# EAGLE board Greenhouse (EAGLE 9.7.0)

Size 101.83 x 101.41 mm. Coordinates in mm from the lower left corner, seen from the top.
Outline: 0,0 101.83,0 101.83,101.41 0,101.41 0,0
Copper layers (1*16): Top 0.035mm / dielectric 1.5mm / Bottom 0.035mm
Design rules "default": minimum track width 6mil, minimum drill 0.35mm, track to track 6mil, track to pad 6mil, pad to pad 6mil, via to via 6mil, smd to smd 6mil, copper to edge 40mil, drill to drill 6mil, minimum pad ring 10mil, minimum via ring 8mil, stop-mask expansion 4mil, vias tented up to drill 0mil, thermal gap 10mil

## Footprints (pad centres in the part's own frame; a part is rotated, then mirrored left to right if it is on the bottom)
LEDRD254W60D565H860B = drill 0.981 pad 1.581: 1 -1.27,0; 2 1.27,0
PIEZO = drill 1 pad 1.6: 1 -3.5,0; 2 3.5,0
RESAD1016W63L850D250B = drill 0.83 pad 1.43: 1 -5.08,0; 2 5.08,0
SWITCH-MOMENTARY-PTH-6.5MM = drill 1.016 pad 1.88: 1 -3.251,2.261; 2 3.251,2.261; 3 -3.251,-2.261; 4 3.251,-2.261
SG90 = drill 1.016 long: 1 -2.54,0; 2 0,0; 3 2.54,0
TO92 = drill 0.813 octagon: 1 -1.27,0; 2 0,1.905; 3 1.27,0
ARDUINO-UNO-R3-SHIELD = drill 1.016 pad 1.88: 3.3V 24.13,-2.54; 5V 24.13,0; A0 24.13,12.7; A1 24.13,15.24; A2 24.13,17.78; A3 24.13,20.32; A4 24.13,22.86; A5 24.13,25.4; AREF -24.13,-13.97; D2 -24.13,20.32; D3 -24.13,17.78; D4 -24.13,15.24; D5 -24.13,12.7; D6 -24.13,10.16; D7 -24.13,7.62; D8 -24.13,3.81; D9 -24.13,1.27; D10 -24.13,-1.27; D11 -24.13,-3.81; D12 -24.13,-6.35; D13 -24.13,-8.89; GND@0 24.13,2.54; GND@1 24.13,5.08; GND@2 -24.13,-11.43; IOREF 24.13,-7.62; NC 24.13,-10.16; RES 24.13,-5.08; RX -24.13,25.4; SCL -24.13,-19.05; SDA -24.13,-16.51; TX -24.13,22.86; VIN 24.13,7.62

## Placement (x,y rotation side)
D1  RED  [LEDRD254W60D565H860B]  17,93.04 180 top
PIEZO1  PIEZO  [PIEZO]  34.95,87.83 0 top
R1  220  [RESAD1016W63L850D250B]  15.73,87.96 90 top
S1  SWITCH_MOMENTARY  [SWITCH-MOMENTARY-PTH-6.5MM]  71.06,90.52 90 top
SERVO3  SERVOSG90  [SG90]  94.85,66.7 0 top
U2  TMP36GT9Z_TO92  [TO92]  61.65,4.83 0 top
U5  ARDUINO-UNO-R3-SHIELD  [ARDUINO-UNO-R3-SHIELD]  47.88,51.78 270 top

## Library data of the parts
D1 = Tinkercad; CATEGORY: Opto-Electronic; SUB-CATEGORY: LED; VALUE: LED_RED
PIEZO1 R1 S1 SERVO3 U2 U5 = Tinkercad

## Nets
D1_C: D1.2 R1.2
U5_5V: SERVO3.2 U2.3 U5.5V
U5_A0: U2.2 U5.A0
U5_D3: S1.1 U5.D3
U5_D8: PIEZO1.1 U5.D8
U5_D9: SERVO3.3 U5.D9
U5_D13: D1.1 U5.D13
U5_GND: PIEZO1.2 R1.1 S1.4 SERVO3.1 U2.1 U5.GND@0 U5.GND@1 U5.GND@2

## Tracks (layer width: path | path; a pad name or v marks a point on that pad's centre or on a via)
D1_C  (1 unrouted)
U5_5V  (2 unrouted)
U5_A0  (1 unrouted)
U5_D3  (1 unrouted)
U5_D8  (1 unrouted)
U5_D9  (1 unrouted)
U5_D13  (1 unrouted)
U5_GND  (7 unrouted)